# Altium PCB main.PcbDoc (part 2 of 2)
Units mm, origin at the board's own origin, x right, y up, seen from the top; angles counter-clockwise.
Board outline 183.51 x 49.02 mm, 2 copper layers (Top Layer, Bottom Layer); 89 components, 67 nets, 308 pads, 66 vias.
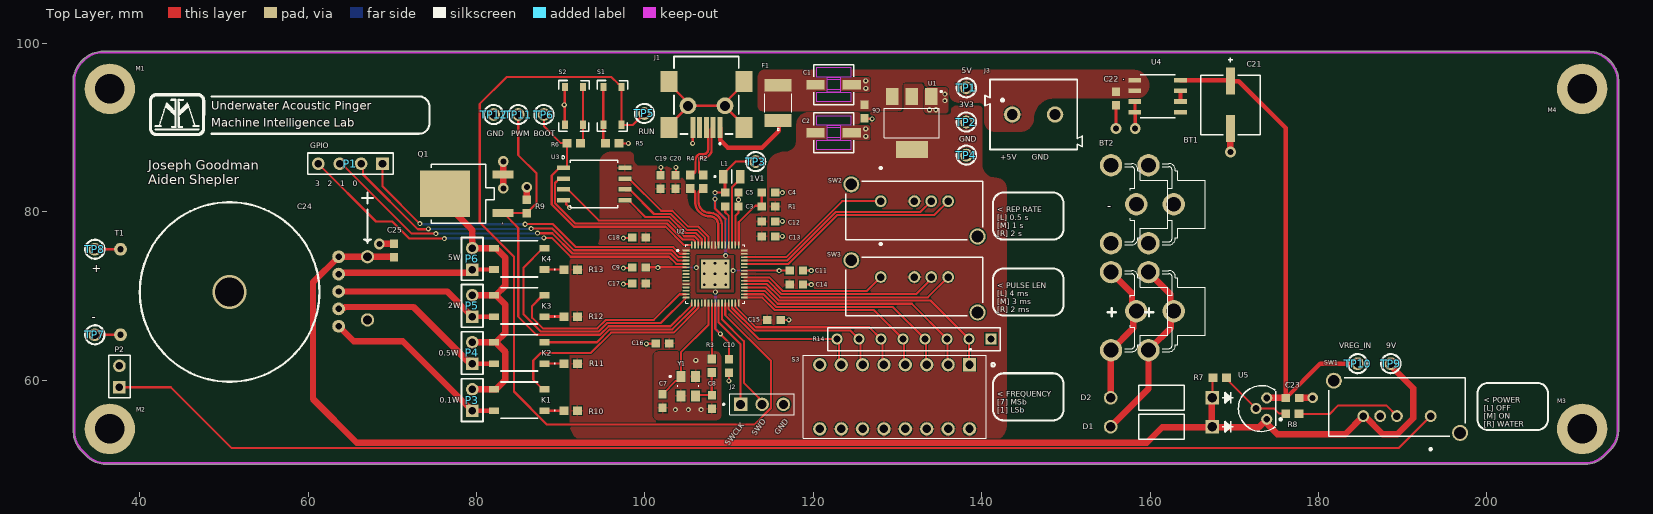
[diagram p0: Top Layer view]

## Silkscreen, mask and mechanical layers (free items; w line width, h text height) (continued)
Top Overlay: (continued)
  text "VREG_IN" at 182.448,63.809 h0.64
  text "0.5W" at 75.514,62.941 h0.64
  text "0.1W" at 75.641,57.353 h0.64
  text "< FREQUENCY / [7] MSb / [1] LSb" at 141.859,56.134 h0.64
  text "< POWER / [L] OFF / [M] ON / [R] WATER" at 199.644,54.483 h0.64
  text "GND" at 115.824,53.467 h0.64 r51.79
  text "SWD" at 113.157,53.34 h0.64 r55.1
  text "SWCLK" at 109.982,52.197 h0.64 r52.65